# Altium PCB Sound_Sensor_v3.0.PcbDoc (part 2 of 3)
Units mil, origin at the board's own origin, x right, y up, seen from the top; angles counter-clockwise.
Board outline 3553.2 x 3464.87 mil, 2 copper layers (Top Layer, Bottom Layer), stack 57 mil thick; 83 components, 60 nets, 303 pads, 73 vias.
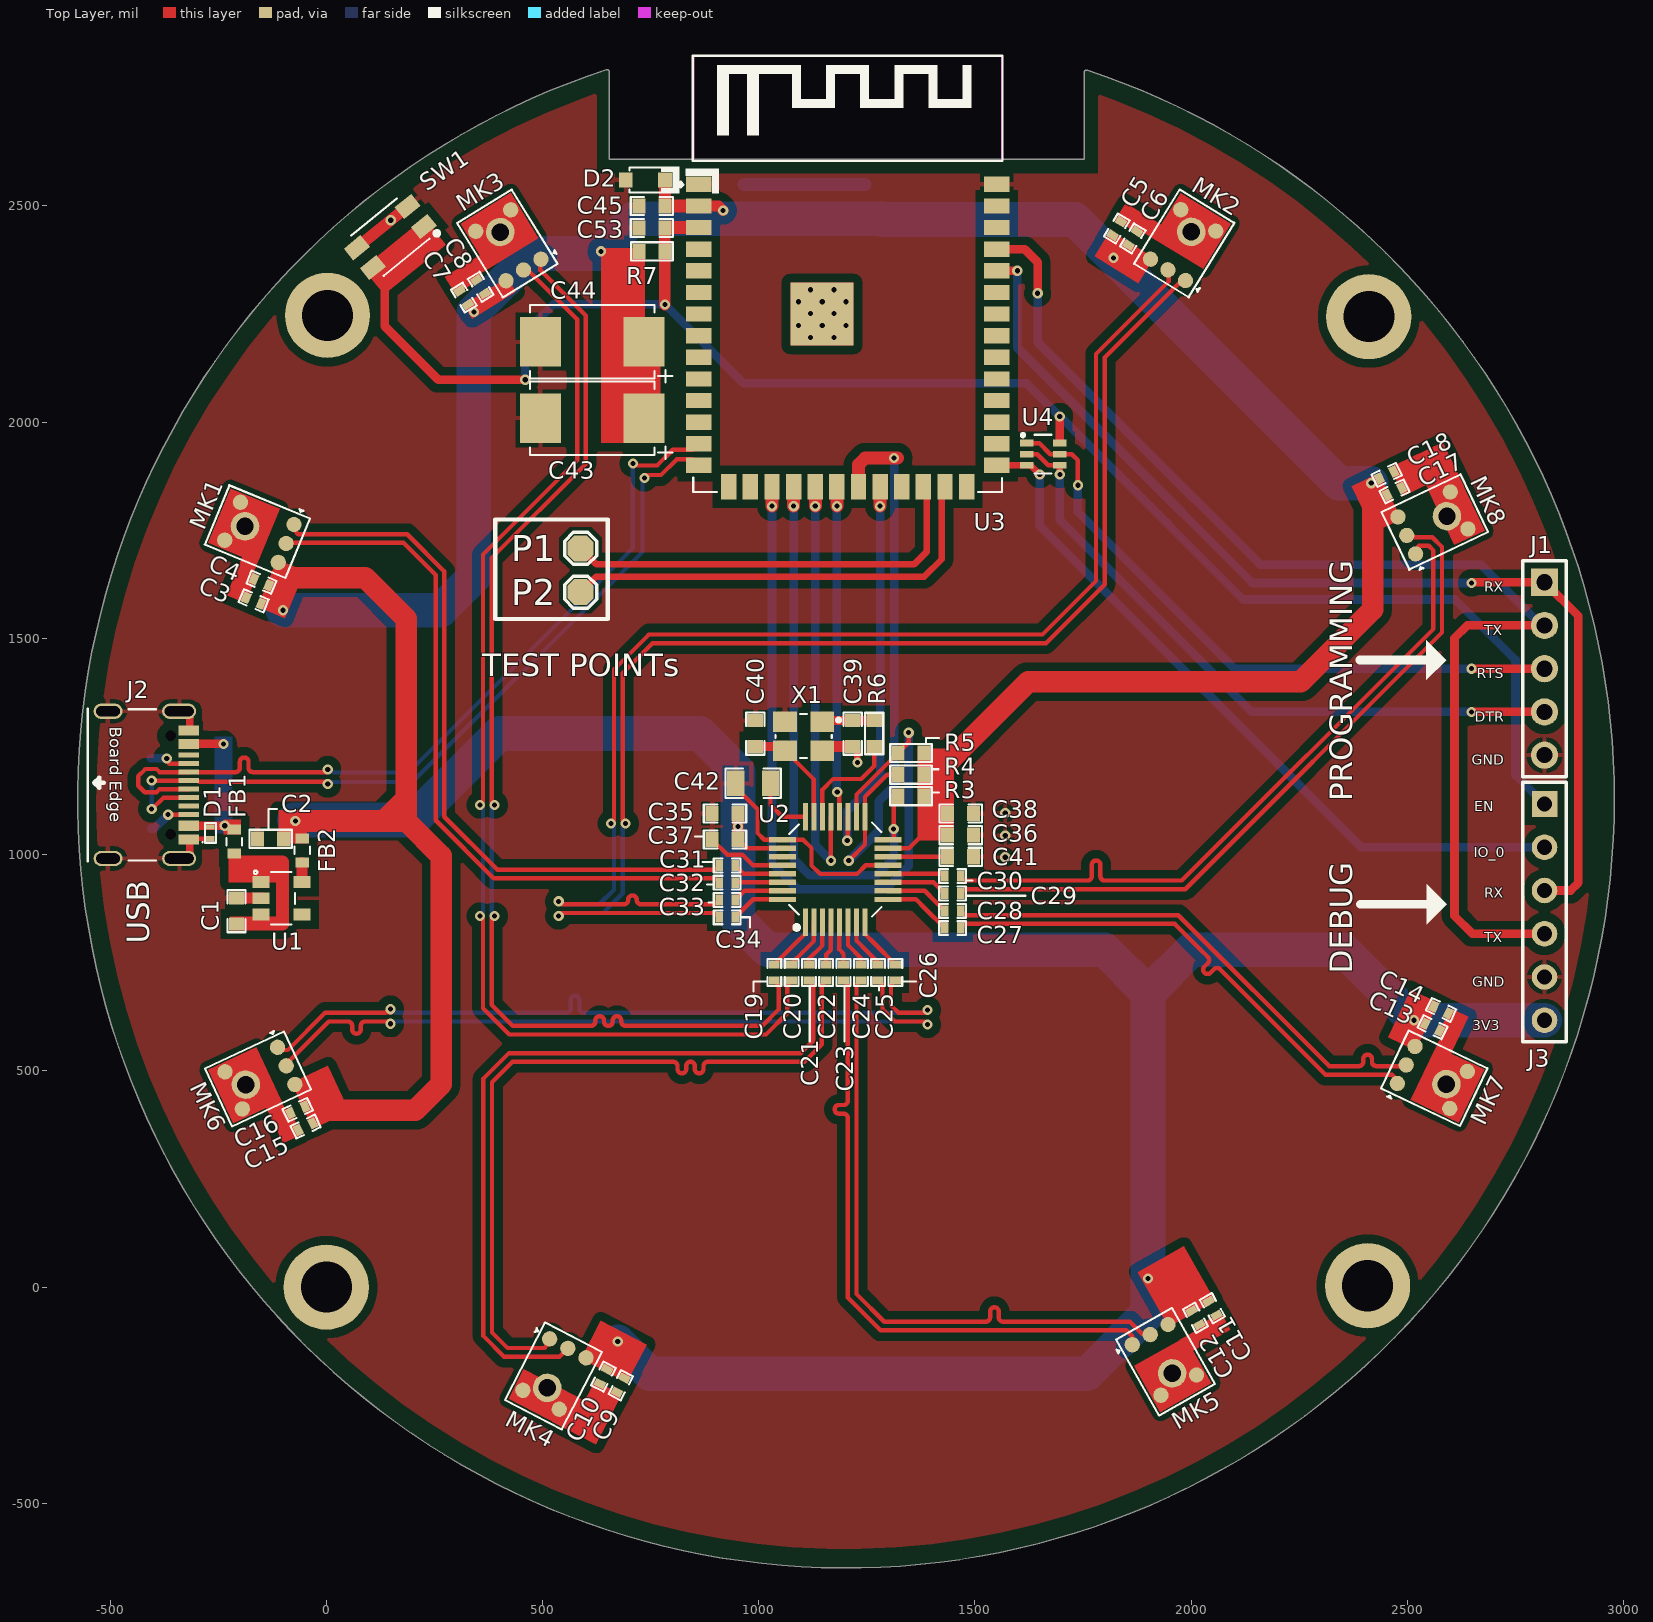
[diagram p0: Top Layer view]

## Part data (continued)
R3 R4 R5: library part CRGH0603J100K, "RES SMD 100K OHM 5% 1/5W 0603", Case Code (Imperial)=0603, Case Code (Metric)=1608, LCSC Part Number=C2074142, Manufacturer="TE Connectivity", Max Operating Temperature=125°C, Min Operating Temperature=-55°C, Number of Resistors=1, Power Rating=200mW, Resistance=100kR, Resistance Tolerance=5%, Resistor Type="Thick Film,Power resistor", Supplier Part Number 1=A126393DKR-ND, Temperature Coefficient=100ppm/°C, Voltage Rating=50V, Case/Package=0603, ComponentLink1Description=http://www.farnell.com/datasheets/2007183.pdf?src-supplier=Element14, ComponentLink1URL=http://www.farnell.com/datasheets/2007183.pdf?src-supplier=Element14, Depth=0.8mm, ELV=Compliant, Height=0.45mm, Item Type=Resistor, Length=1.6mm, Manufacturer Part Number=CRGH0603J100K, Mount="Surface Mount", Number of Terminations=2, Packaging="Tape and Reel", Pricing 1="1=0.1, 10=0.049, 100=0.02, 1000=0.00899, 2500=0.0078 (USD)", REACH SVHC="No SVHC", RoHS Compliant=Yes, Series=CRGH, Stock 1=23277, Supplier 1=Digi-Key, Technology="THICK FILM", Termination=Solder, Tolerance=5%, Voltage Rating (DC)=50V, Width=0.8mm
R6: library part RC0603JR-070RL, "RES 0 OHM JUMPER 1/10W 0603", Case Code (Imperial)=0603, Case Code (Metric)=1608, LCSC Part Number=C95177, Manufacturer=Yageo, Max Operating Temperature=155°C, Max Power Dissipation=100mW, Min Operating Temperature=-55°C, Package Quantity=5000, Resistance=0mR, Resistance Tolerance=5%, Resistor Type="Thick Film", Supplier Part Number 1=311-0.0GRCT-ND, Temperature Coefficient=200ppm/°C, Tolerance=1%, Voltage Rating=50V, Case/Package=0603, Category="Chip SMD Resistors", Construction=Rectangular, Contact Plating=Tin,Matte, Depth=0.8mm, Features="Moisture Resistant", Height=0.45mm, Item Type=Resistor, Lead Free="Lead Free", Length=1.6mm, Manufacturer Part Number=RC0603JR-070RL, Military Standard=Not, Number of Pins=2, Number of Terminations=2, Packaging="Tape and Reel", Power Rating=100mW, Pricing 1="1=0.10000, 10=0.01700, 25=0.01240, 50=0.00960, 100=0.00700, 250=0.00536, 500=0.00430, 1000=0.00316 (USD)", Radiation Hardening=No, Reach SVHC Compliant="No SVHC", RoHS=Yes, RoHS Compliant=Yes, Series=RC, Size Code=0603, Stock 1=18081776, Supplier 1=Digi-Key, Technology="THICK FILM", Termination=SMD/SMT, Voltage Rating (DC)=50V, Width=0.8mm
R7: library part AC0603JR-0710KL, "RES SMD 10K OHM 5% 1/10W 0603", Case Code (Imperial)=0603, Case Code (Metric)=1608, LCSC Part Number=C140867, Manufacturer=Yageo, Max Operating Temperature=155°C, Max Power Dissipation=100mW, Min Operating Temperature=-55°C, Package Quantity=1, Resistance=10kR, Resistor Type="Thick Film", Supplier Part Number 1=1029044, Temperature Coefficient=100ppm/°C, Tolerance=5%, Voltage Rating=50V, Case/Package=0603, Category="Chip SMD Resistors", ComponentLink1Description=https://datasheet.ciiva.com/5562/pyu-ac-51-rohs-l-2-5562553.pdf?src-supplier=Mouser, ComponentLink1URL=https://datasheet.ciiva.com/5562/pyu-ac-51-rohs-l-2-5562553.pdf?src-supplier=Mouser, Construction=Rectangular, Depth=0.8mm, Features="Moisture Resistant,Automotive AEC-Q200,Anti-Sulfur", Height=0.022inch, Item Type=Resistor, Lead Free="Lead Free", Length=0.063inch, Manufacturer Part Number=AC0603JR-0710KL, Military Standard=Not, Number of Terminations=2, Packaging="Tape and Reel", Power Rating=100mW, Pricing 1="5000=0.00540 (USD)", RoHS=Yes, RoHS Compliant=Yes, Series=AC, Size Code=0603, Stock 1=1533000, Supplier 1="Future Electronics", Termination=SMD/SMT, Width=0.031inch
SW1: library part TS-1185EC-C-D-B, "3mm 2mm Round Button 50mA Top3.65mm SPST 12V SMD Tactile Switches", Manufacturer=XKB, Package=Custom, ComponentLink1Description=LCSC, ComponentLink1URL=https://lcsc.com/product-detail/Tactile-Switches_XKB-Connectivity-TS-1185EC-C-D-B_C318893.html, Manufacturer Part No=TS-1185EC-C-D-B
U1: "Linear Voltage Regulator IC Positive Fixed 1 Output 3.3V 1A SOT-25", Case/Package=SOT-25, Dropout Voltage=655mV, Manufacturer=Torex, Max Input Voltage=6V, Max Operating Temperature=85°C, Min Current Limit=1.005A, Min Input Voltage=1.6V, Min Operating Temperature=-40°C, Nominal Output Voltage=3.3V, Output Current=1A, Package Quantity=1, Supplier Part Number 1=84R0738, Category="Voltage Regulators - Linear", ComponentLink1Description=https://datasheet.ciiva.com/7992/610888-7992813.pdf?src-supplier=Element14, ComponentLink1URL=https://datasheet.ciiva.com/7992/610888-7992813.pdf?src-supplier=Element14, ComponentLink2Description=https://datasheet.ciiva.com/5755/610888-5755886.pdf?src-supplier=Farnell, ComponentLink2URL=https://datasheet.ciiva.com/5755/610888-5755886.pdf?src-supplier=Farnell, ComponentLink3Description=https://datasheet.ciiva.com/2040/xc6220-2040201.pdf?src-supplier=Digi-Key, ComponentLink3URL=https://datasheet.ciiva.com/2040/xc6220-2040201.pdf?src-supplier=Digi-Key, ComponentLink4Description=https://datasheet.ciiva.com/2040/xc6220-2040200.pdf?src-supplier=Digi-Key, ComponentLink4URL=https://datasheet.ciiva.com/2040/xc6220-2040200.pdf?src-supplier=Digi-Key, ComponentLink5Description=https://datasheet.ciiva.com/2040/xc6220-2040202.pdf?src-supplier=Digi-Key, ComponentLink5URL=https://datasheet.ciiva.com/2040/xc6220-2040202.pdf?src-supplier=Digi-Key, Manufacturer Part Number=XC6220B331MR-G, Mount="Surface Mount", Number of Pins=5, Number of Regulators=1, Output Type=Fixed, Output Voltage=3.3V, Packaging="Tape and Reel", Pricing 1="1=1.20000, 10=1.08000, 100=0.83900, 500=0.69300, 1000=0.54800 (USD)", REACH SVHC="No SVHC", RoHS=Yes, RoHS Compliant=Yes, Series=-, Stock 1=3078, Supplier 1=Newark
U2: "IC ADC 24BIT SIGMA-DELTA 32TQFP", Manufacturer="Texas Instruments", Supplier Part Number 1=595-ADS131M08IPBSR, Category="Analog to Digital Converters (ADCs)", Manufacturer Part Number=ADS131M08IPBSR, Pricing 1="1=8.85000, 10=7.99000, 50=7.62000, 100=6.62000, 1000=5.39000, 10000=5.39000 (USD)", RoHS=Yes, Supplier 1=Mouser
U3: "SMD,18x25.5mm WiFi Modules ROHS", LCSC Part Number=C2913204, Manufacturer="Espressif Systems", Supplier Part Number 1=1965-ESP32-S3-WROOM-1-N8R2-ND, Category=Uncategorized, ComponentLink1Description=LCSC, ComponentLink1URL=https://www.lcsc.com/product-detail/WiFi-Modules_Espressif-Systems-ESP32-S3-WROOM-1-N8R2_C2913204.html, Item Type=Module, Manufacturer Part Number=ESP32-S3-WROOM-1-N8R2, RoHS=No, Supplier 1=Digi-Key
U4: "2 NPN pre-biased (Dual) 150mW 100mA 50V SC-70-6(SOT-363) Digital Transistors ROHS", Manufacturer=Changjiang, Package=SC-70-6(SOT-363), ComponentLink1Description=LCSC, ComponentLink1URL=https://www.lcsc.com/product-detail/Digital-Transistors_Changjiang-Electronics-Tech-CJ-UMH3N_C62892.html, Manufacturer Part No=UMH3N
X1: "8.192MHz SMD Crystal Resonator 12pF 150Ω ±10ppm ±30ppm -40℃~+85℃ SMD_3225_4P Crystals ROHS", Manufacturer=JYJE, Package=Custom, Manufacturer Part No=3TJ481920NYLBC

## Free pads (board coordinates)
  round 196.85 hole 118.11: MH1(2.69,2247.06) MH2(0,0) MH3(2408,3.15) MH4(2410.69,2243.91)

## Via types
v1: diameter 23.62, hole 11.81, Top Layer to Bottom Layer, 73 vias

## Nets (pads, with @x,y where several pads share a name; then routed paths per layer and width w, separated by ;. In a path a pad name is that pad's centre, name@x,y a point inside that pad or via, vN(x,y) a via of type N, cw(c..) or ccw(c..) an arc to the next point about the centre after c; other vN are vias at no path point)
3V3: C2.1 C3.1 C4.1 C5.1 C6.1 C7.1 C8.1 C9.1 C10.1 C11.1 C12.1 C13.1 C14.1 C15.1 C16.1 C17.1 C18.1 C35.1 C36.1 C37.1 C38.1 C43.1 C44.1 C45.1 C46.1 C47.1 C48.1 C49.1 C50.1 C51.1 C52.1 D2.1 FB2.2 J3.6 MK1.5 MK2.5 MK3.5 MK4.5 MK5.5 MK6.5 MK7.5 MK8.5 R3.2 R4.2 R5.2 R7.1 U2.15 U2.26 U3.2 | length 13259.5
  Top Layer w10: C37.1@952,1035 972.24,1014.76 U2.26@1054.64,1014.76 ; U2.15@1298.73,1014.76 1347.76,1014.76 1379,1046
  Top Layer w15: v1(635,2395) R7.1@722.99,2395
  Top Layer w25: U3.2@861.02,2500 907.44,2500 v1(917.69,2489.75) ; C37.1@952,1035 v1(952,1065) C35.1@952,1095
  Top Layer w27: C44.1@723,2208.06 R7.1@722.99,2395
  Top Layer w28: C45.1@783.28,2500.28 D2.1@783.27,2560
  Top Layer w30: C45.1@784,2500 U3.2@861.02,2500
  Top Layer w50: -71.07,1059.98 -71.57,1060.48 v1(-71.57,1077.77) 184.53,1077.77 ; -70,1640 90,1640 184.53,1545.47 184.53,1077.77 ; 5.34,409 205.84,409 265.59,468.75 265.59,996.71 184.53,1077.77 ; 1409.5,1139 1409.5,1186.32 1623.18,1400 2253.18,1400 2420,1566.82 2420,1805.51 2428.09,1813.59
  Bottom Layer w80: v1(-100,1565) 265,1565 341.32,1641.32 v1(341.32,2254.98) 476.34,2390 630,2390 v1(635,2395) 710,2470 1287.28,2470 ; v1@-74.48,1080 200,1080 399.98,1279.98 863.89,1279.98 952,1191.87 v1(952,1065) 952,848 1020,780 1800,780 1900,680 ; v1(674,-126) 748,-200 1760,-200 1900,-60 v1(1900,20) 1900,680 ; 1284.32,2468.68 1731.32,2468.68 v1(1820,2380) 2341.02,1858.98 v1(2416.32,1858.98) ; J3.6@2817.01,617.01 v1(2515,617) 2352,780 2000,780 1900,680
5V: C1.1 FB1.2 U1.1 U1.3 | length 143
  Top Layer w30: -100.8,839.72 -100.8,982.72
\C\S\: R4.1 U2.17 U3.21 | length 1382.9
  Top Layer w10: v1(1208,986) 1245.58,1023.58 U2.17@1245.58,1087.6 1245.58,1133.58 1297,1185 R4.1@1322,1185
  Top Layer w30: U3.21@1230.71,1850.79 1230.71,1901.71 1246,1917 v1@1321,1917
  Bottom Layer w20: v1(1208,986) 1277.32,1055.32 1277.32,1123.32 1313,1159 v1(1313,1917)
\D\R\D\Y\: R5.1 U2.18 U3.17 | length 1787.1
  Top Layer w10: U2.18@1225.9,1087.6 1225.9,1138.9 R5.1@1322,1235 1346.73,1259.73 v1(1346.73,1282)
  Top Layer w30: v1(1030.71,1805.71) U3.17@1030.71,1850.79
  Bottom Layer w20: v1(1030.71,1805.71) 1030.71,979.29 1090,920 1293.06,920 1346.73,973.67 v1(1346.73,1282)
\R\E\S\E\T\: R3.1 U2.16 U3.18 | length 1280.7
  Top Layer w10: U2.16@1312,1036.35 R3.1@1312,1125
  Top Layer w30: v1(1080.71,1805.71) U3.18@1080.71,1850.79
  Bottom Layer w20: v1(1080.71,1805.71) 1080.71,989.29 1118.02,951.98 1271.98,951.98 1312,992 v1(1312,1059.21)
ADC1_XIN: R6.1 U2.22 | length 250.1
  Top Layer w10: U2.22@1147.16,1087.6 1147.16,1150.16 1172,1175 1237,1175 1267,1205 R6.1@1267,1250
ADC1_XOUT#: C40.2 U2.23 X1.3 | length 239.8
  Top Layer w10: X1.3@1060.39,1240.59 1127.47,1173.5 U2.23@1127.47,1087.6
  Top Layer w20: C40.2@992,1250 X1.3@1050.98,1250
CAP: C42.2 U2.24 | length 142.1
  Top Layer w10: C42.2@1027,1165 1027,1115 1054.4,1087.6 U2.24@1107.79,1087.6
"DEBUG SIG.ENABLE": C53.1 J3.1 R7.2 SW1.1 U3.3 U4.6 | length 3995.5
  Top Layer w20: 174.45,2390.68 135,2351.23 135,2222 259,2098 v1(460,2098) ; 1696.19,1959.46 v1@1696.19,2013
  Top Layer w27: v1(783,2272) C53.1@782.99,2449.02
  Top Layer w30: C53.1@784,2450 U3.3@861.02,2450
  Bottom Layer w20: v1(460,2098) 460,2207 526,2273 v1@783,2273 ; v1(783,2272) 965,2090 1619,2090 v1(1696,2013) ; v1@1696.98,2013 1709.64,2000.34 1778.45,1931.53 2119.98,1590 2610,1590 2750,1450 2750,1184.02 J3.1@2817.01,1117.01
"DEBUG SIG.IO_0": J3.2 U3.27 U4.3 | length 1696.9
  Top Layer w15: U3.27@1550.41,1900.41 U4.3@1619.81,1900.41 1628.59,1900.41 v1@1652.81,1876.19
  Bottom Layer w20: v1@1650,1869.68 1650,1760 2392.99,1017.01 J3.2@2817.01,1017.01
  other v1: 1649.81,1879.19
DTR: J1.4 U4.2 U4.4 | length 1518.2
  Top Layer w10: U4.2@1619.81,1926 1644,1926 1669.59,1900.41 U4.4@1696.19,1900.41
  Top Layer w15: v1(1696.19,1879.19) U4.4@1696.19,1900.41
  Top Layer w20: v1(2648,1330) J1.4@2817.01,1330
  Bottom Layer w20: v1(1696.19,1879.19) 1696.19,1773.81 2140,1330 v1(2648,1330)